# Altium PCB Mosione.PcbDoc
Units mm, origin at the board's own origin, x right, y up, seen from the top; angles counter-clockwise.
Board outline 77.58 x 77.84 mm, 2 copper layers (Top Layer, Bottom Layer); 14 components, 23 nets, 93 pads, 2 vias.
Unrouted connection lines stored in the file: 9.
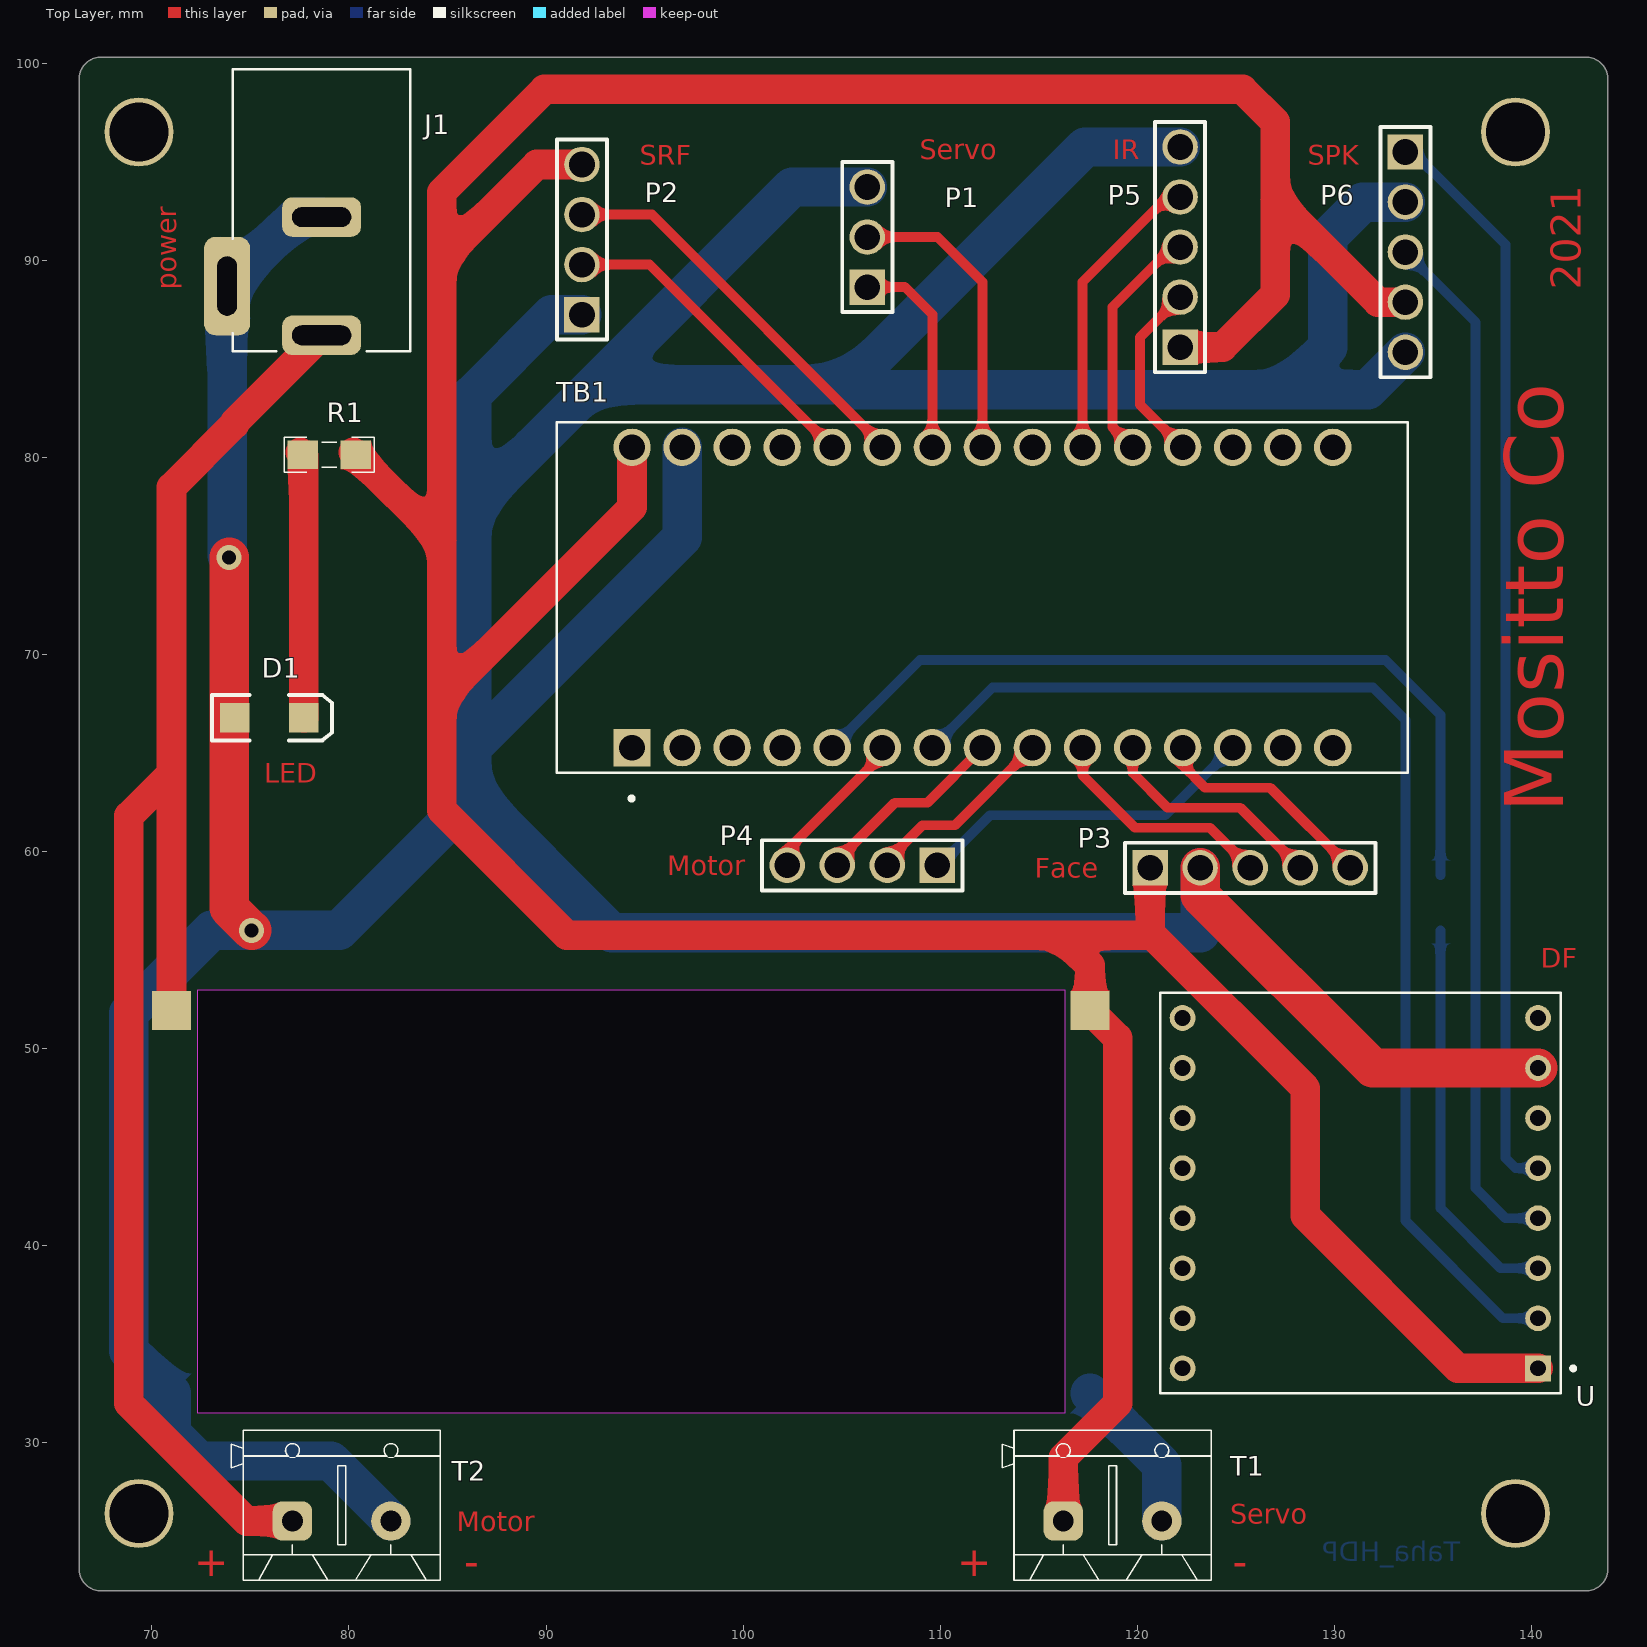
[diagram p0: Top Layer view]
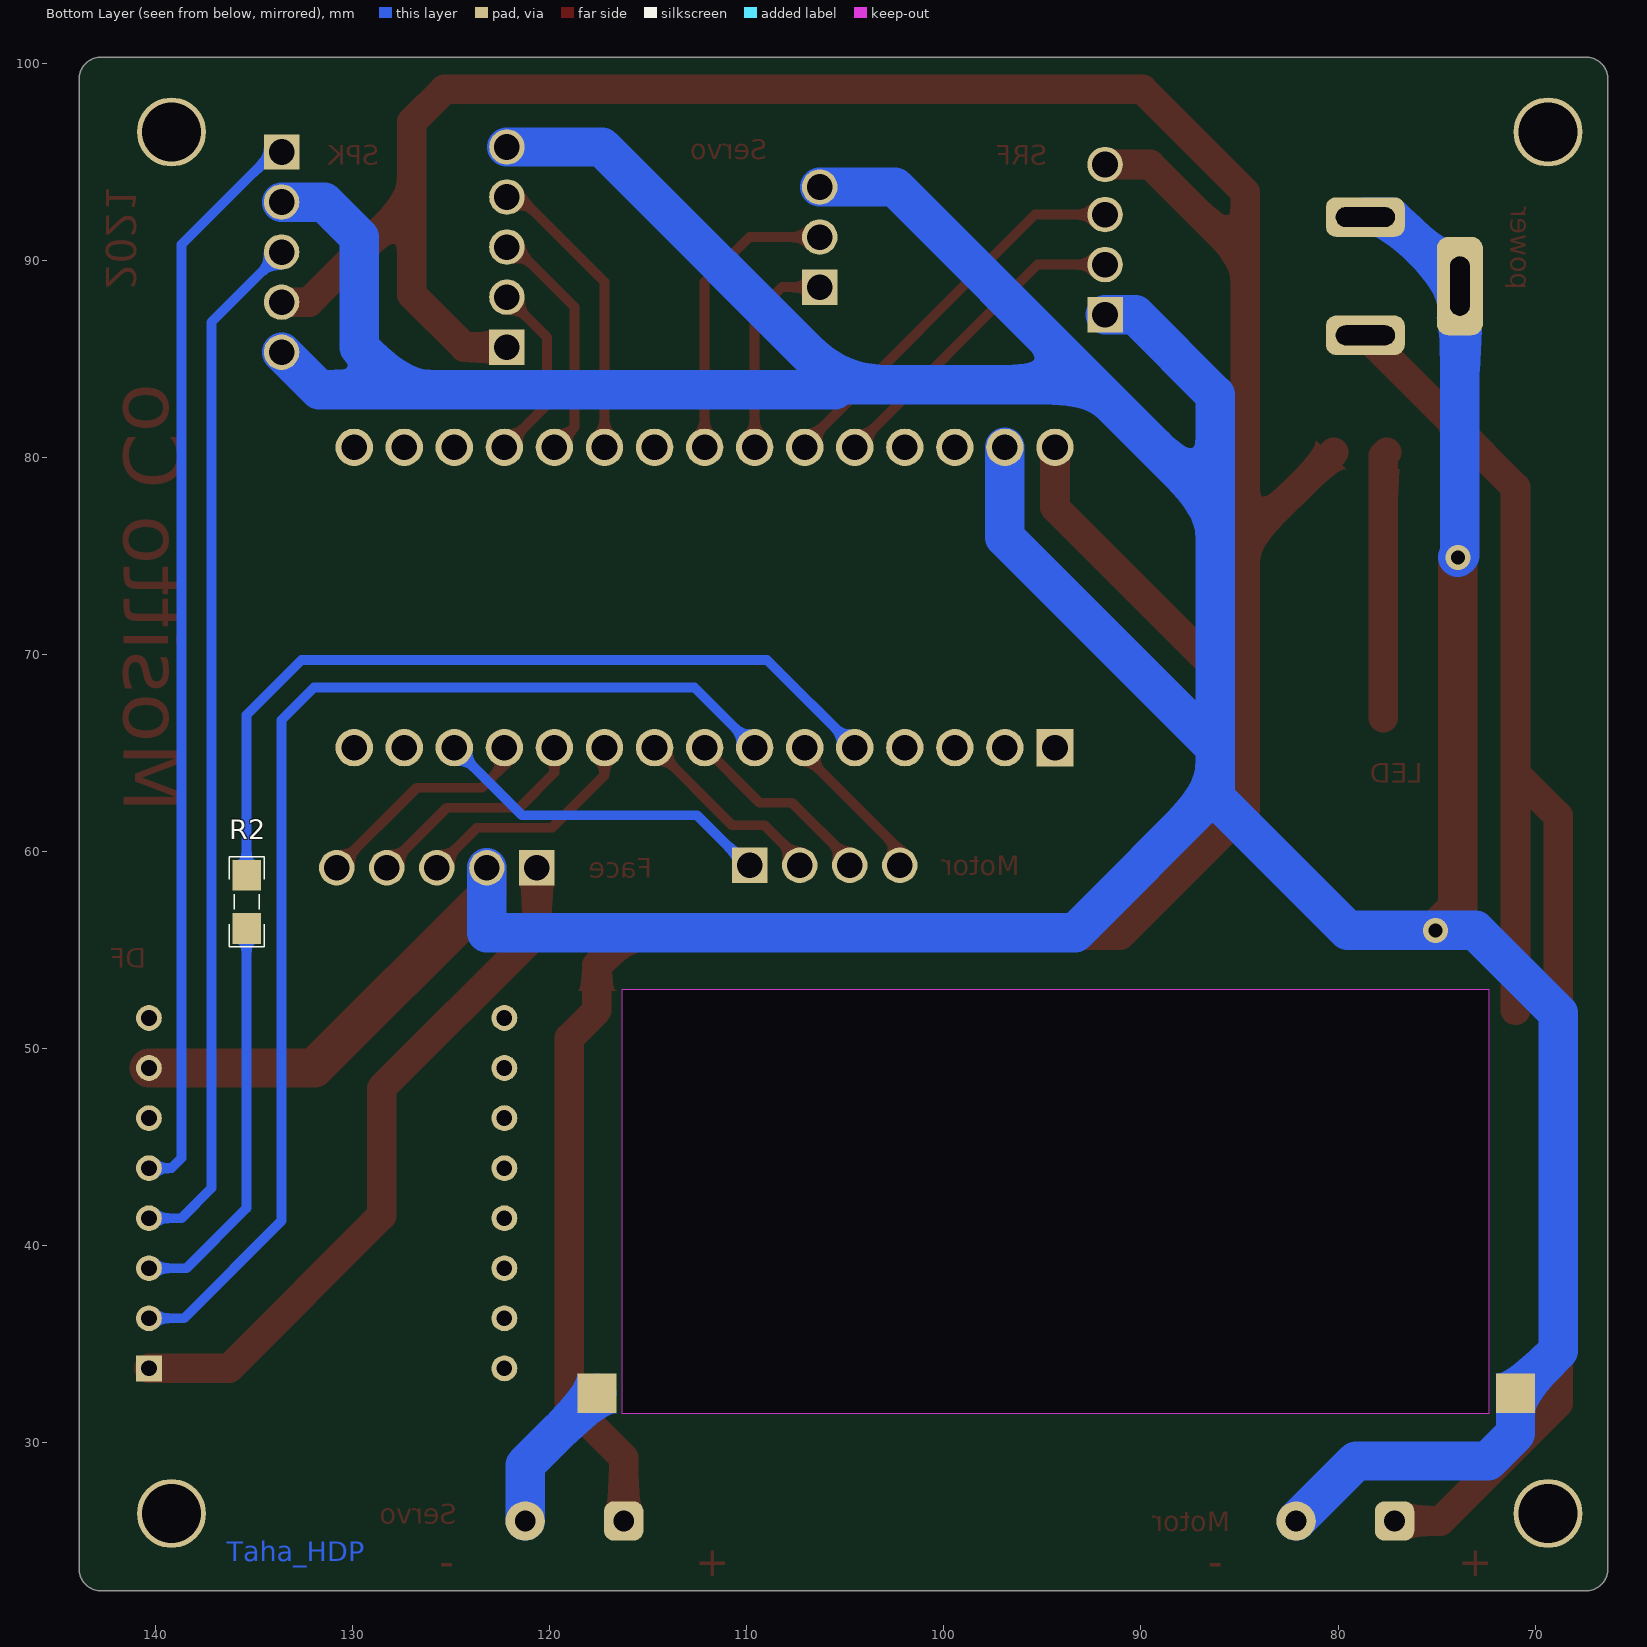
[diagram p1: Bottom Layer view, seen from below]
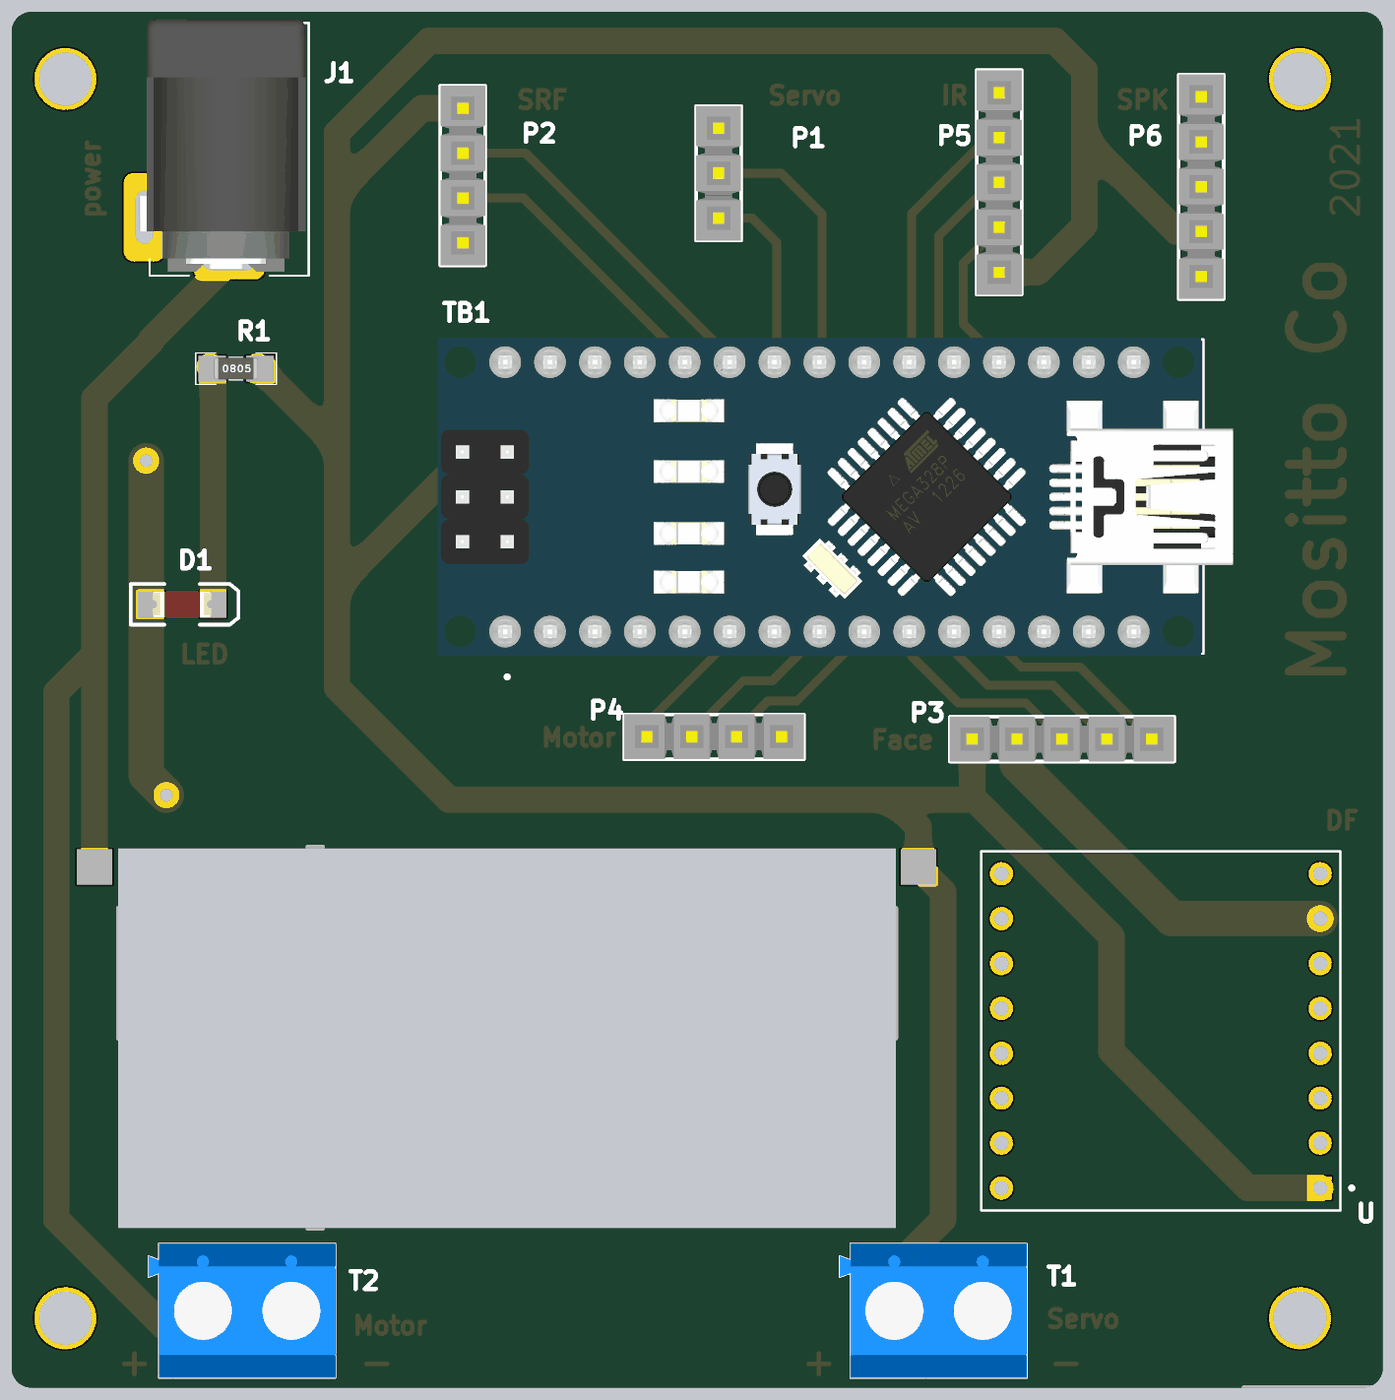
[diagram p2: 3D render of the assembled board from above, using the file's embedded part models]

## Layer stack, top to bottom
Top Solder: solder mask 0.0102, Solder Resist, Dk 3.5
Top Layer: signal copper 0.0356
Dielectric 1: dielectric 0.32, FR-4, Dk 4.8
Bottom Layer: signal copper 0.0356
Bottom Solder: solder mask 0.0102, Solder Resist, Dk 3.5

## Board outline
66.301,23.622 66.301,99.187 cw(c67.437,99.187) 67.437,100.323 142.748,100.323 cw(c142.748,99.187) 143.884,99.187 143.884,23.622 cw(c142.748,23.622) 142.748,22.486 67.437,22.486 cw(c67.437,23.622)
cut-out: 72.332,52.996 116.332,52.996 116.332,31.496 72.332,31.496

## Design rules (kind name [scope] priority, off if disabled: settings)
Clearance [All] p1: gap=0.254 ignorepadtopadclearanceinfootprint=FALSE except(0: Arc-Hole Track-Hole SMDPad-Hole THPad-Hole Via-Hole Fill-Hole Poly-Hole Region-Hole Text-Hole)
PolygonConnect [All] p1: connectstyle=Relief reliefconductorwidth=0.254 reliefentries=4 polygonreliefangle="90 Angle" airgapwidth=0.254
RoutingVias [All] p1: holewidth=0.711 width=1.27 viastyle="Through Hole" minholewidth=0.711 minwidth=1.27 maxholewidth=0.711 maxwidth=1.27
SolderMaskExpansion [All] p1: expansion=0.102
Width "Schematic Width Constraint_6" [InNet('VCC')] p1: maxlimit=2 minlimit=1.5 preferedwidth=1.5
Width "Schematic Width Constraint_2" [InNet('9V')] p2: maxlimit=2 minlimit=0.5 preferedwidth=1.5
Width "Schematic Width Constraint_1" [InNet('GND')] p3: maxlimit=2 minlimit=0.5 preferedwidth=2
Width "Schematic Width Constraint" [InNet('NetD1_2')] p4: maxlimit=2 minlimit=1.5 preferedwidth=1.5
Width [All] p5: maxlimit=1 minlimit=0.3 preferedwidth=0.5 minimp=50.000000 maximp=50.000000 favimp=50.000000
30 further rules are at their usual default settings.

## Components (designator, comment, footprint, x,y, rotation, side; value= is the part's Value field where it differs from the comment)
D1 "SMD 1206 LED" "LED 1206" 75.946,66.802 r0 top
J1 "DC-005" *NINIGI_DC-005 78.613,88.702 r270 top
P1 "Servo" HDR1X3 106.299,88.646 r90 top
P2 "SRF" HDR1X4 91.821,87.249 r90 top
P3 "LCD_face" HDR1X5 120.65,59.182 r0 top
P4 "Motor" HDR1X4 109.855,59.309 r180 top
P5 "IR_sensor" HDR1X5 122.174,85.598 r90 top
P6 "SPK" HDR1X5 133.604,95.504 r270 top
R1 "200" RESC3413X04N 78.994,80.137 r0 top
R2 "1K" RESC3413X04N 135.382,57.451 r90 bottom
T1 "KF301_Terminal" "KF301 2PIN" 118.745,26.035 r0 top
T2 "KF301_Terminal" "KF301 2PIN" 79.629,26.035 r0 top
TB1 "ARDUINO_NANO" *SHIELD_ARDUINO_NANO 112.141,72.898 r90 top
U "DFR0299" MODULE_DFR0299 131.318,42.672 r180 top

## Footprints (in the part's own frame and the unit in brackets; to place one, negate y for a bottom-side part, rotate by r counter-clockwise, add the part's x,y. Pads: shape width x height; smd on the part's side, far side on the other; paste and mask are expansions set on the pad)
*NINIGI_DC-005 [mm]
  rrect50% 5x2.35 hole 1 slot 3 at 0 deg: 2(0,-4.8)
  rrect50% 2x4 hole 1 slot 3 at 90 deg: 3(-3.5,0) 4(2.5,0)
  silkscreen extent -11,-4.5 3.3,4.5, body extent -11.21,-5.08 3.09,4.32, height 11
*SHIELD_ARDUINO_NANO [mm]
  rect 1.9x1.9 hole 1.3: 1(-7.62,17.78)
  round 1.9 hole 1.3: 2(-7.62,15.24) 3(-7.62,12.7) 4(-7.62,10.16) 5(-7.62,7.62) 6(-7.62,5.08) 7(-7.62,2.54) 8(-7.62,0) 9(-7.62,-2.54) 10(-7.62,-5.08) 11(-7.62,-7.62) 12(-7.62,-10.16) 13(-7.62,-12.7) 14(-7.62,-15.24) 15(-7.62,-17.78) 16(7.62,-17.78) 17(7.62,-15.24) 18(7.62,-12.7) 19(7.62,-10.16) 20(7.62,-7.62) 21(7.62,-5.08) 22(7.62,-2.54) 23(7.62,0) 24(7.62,2.54) 25(7.62,5.08) 26(7.62,7.62) 27(7.62,10.16) 28(7.62,12.7) 29(7.62,15.24) 30(7.62,17.78)
  silkscreen extent -10.3,-21.59 8.89,21.59, body extent -9.02,-23.26 8.98,21.74, height 10.1
HDR1X3 [mm] "Connector; Header; 3 Position"
  rect 1.8x1.8 hole 1.3: 1(0,0)
  round 1.8 hole 1.3: 2(2.54,0) 3(5.08,0)
  silkscreen extent -1.27,-1.27 6.35,1.27, body extent -1.26,-1.27 6.36,1.27, height 8.38
HDR1X4 [mm] "Connector; Header; 4 Position"
  rect 1.8x1.8 hole 1.3: 1(0,0)
  round 1.8 hole 1.3: 2(2.54,0) 3(5.08,0) 4(7.62,0)
  silkscreen extent -1.27,-1.27 8.89,1.27, body extent -1.27,-1.28 8.89,1.26, height 8.38
HDR1X5 [mm] "Connector; Header; 5 Position"
  rect 1.8x1.8 hole 1.3: 1(0,0)
  round 1.8 hole 1.3: 2(2.54,0) 3(5.08,0) 4(7.62,0) 5(10.16,0)
  silkscreen extent -1.27,-1.27 11.43,1.27, body extent -1.28,-1.27 11.42,1.27, height 8.38
"KF301 2PIN" [mm] "Designer Abbas Basereh"
  rrect50% 2x2 hole 1.05: 1(-2.5,0)
  round 2 hole 1.05: 2(2.5,0)
  silkscreen extent -5.6,-3 5,4.6, body extent -5.6,-3 5,4.6, height 10
"LED 1206" [mm]
  rect 1.5x1.5 smd: 1(-1.75,0) 2(1.75,0)
  silkscreen extent -2.9,-1.15 3.2,1.15, body extent -1.65,-0.72 1.65,0.73, height 1.36
MODULE_DFR0299 [mm]
  rect 1.308x1.308 hole 0.8: 1(-9.017,8.89)
  round 1.308 hole 0.8: 2(-9.017,6.35) 3(-9.017,3.81) 4(-9.017,1.27) 5(-9.017,-1.27) 6(-9.017,-3.81) 7(-9.017,-6.35) 8(-9.017,-8.89) 9(9.017,-8.89) 10(9.017,-6.35) 11(9.017,-3.81) 12(9.017,-1.27) 13(9.017,1.27) 14(9.017,3.81) 15(9.017,6.35) 16(9.017,8.89)
  silkscreen extent -10.9,-10.16 10.16,10.16
RESC3413X04N [mm] "Chip Resistor, 2-Leads, Body 3/40x1/30mm, IPC Medium Density-Design:Abbas Basereh"
  rect 1.55x1.45 smd: 1(-1.35,0) 2(1.35,0)
  silkscreen extent -2.29,-0.89 2.29,0.89, body extent -1.25,-0.62 1.25,0.62, height 0.79

## Part data
D1: library part "LED SMD 1206"
J1: Package="0603 Ninigi", Availability=Unavailable, MF="Littelfuse Inc.", MP=DC-005, PRICE=None, SnapEDA_Link=https://www.snapeda.com/parts/DC-005/Littelfuse%20Inc./view-part/?ref=snap
P1: library part "Header 3", "Header, 3-Pin", LatestRevisionDate=17-Jul-2002, LatestRevisionNote="Re-released for DXP Platform.", Publisher="Altium Limited"
P2 P4: library part "Header 4", "Header, 4-Pin", LatestRevisionDate=17-Jul-2002, LatestRevisionNote="Re-released for DXP Platform.", Publisher="Altium Limited"
P3 P5 P6: library part "Header 5", "Header, 5-Pin", LatestRevisionDate=17-Jul-2002, LatestRevisionNote="Re-released for DXP Platform.", Publisher="Altium Limited"
R1 R2: library part "RES 0805 0.125W", "RES 0805", Data=16-12-2016, Desc.="RES SMD 0805", Designer="Abbas Basereh"
T1 T2: library part KF301-2Pin_Terminal, "Terminal 2 Pin 250VAC 16A", Designer="Abbas Basereh", Link=https://www.aliexpress.com/item/, Part. No="KF301 2P"
TB1: "ATmega4809 Arduino Nano Every with Headers AVRA® AVR MCU 8-Bit Embedded Evaluation Board", Package=None, Availability=Unavailable, MF=Arduino, MP="ARDUINO NANO", PRICE=None, SnapEDA_Link=https://www.snapeda.com/parts/ARDUINO%20NANO/Arduino/view-part/1128261/?ref=snap
U: "MP3 Player Audio Arduino Platform Evaluation Expansion Board", Package=None, Availability=Unavailable, MF=DFRobot, MP=DFR0299, PRICE=None, SnapEDA_Link=https://www.snapeda.com/parts/DFR0299/DFRobot/view-part/588059/?ref=snap

## Free pads (board coordinates)
  rect 2x2 smd far side: 13(117.602,32.512) 14(70.993,32.512)
  rect 2x2 smd: 14(70.993,51.943) 14(117.602,51.943)
  round 3.5 hole 3: 15(69.342,26.416) 15(69.342,96.52) 15(139.192,26.416) 15(139.192,96.52)

## Via types
v1: diameter 1.27, hole 0.711, Top Layer to Bottom Layer, 2 vias

## Nets (pads, with @x,y where several pads share a name; then routed paths per layer and width w, separated by ;. In a path a pad name is that pad's centre, name@x,y a point inside that pad or via, vN(x,y) a via of type N, cw(c..) or ccw(c..) an arc to the next point about the centre after c; other vN are vias at no path point)
9V: J1.4 pad.14@70.993,51.943 T2.1 | length 81
  Top Layer w1.5: pad.14@70.993,51.943 70.993,63.973 ; T2.1 74.803,26.035 68.834,32.004 68.834,61.814 70.993,63.973 ; J1.4 74.199,81.788 74.199,81.692 70.993,78.486 70.993,63.973
CLK: P3.5 TB1.12 | length 11.6
  Top Layer w0.5: TB1.12 122.301,64.389 123.444,63.246 126.746,63.246 P3.5
CS: P3.4 TB1.11 | length 11.8
  Top Layer w0.5: TB1.11 119.761,64.008 121.539,62.23 125.222,62.23 P3.4
DIN: P3.3 TB1.10 | length 11.9
  Top Layer w0.5: TB1.10 117.221,63.881 119.888,61.214 123.698,61.214 P3.3
echo: P2.2 TB1.26 | length 16.5
  Top Layer w0.5: P2.2 95.25,89.789 TB1.26
GND: D1.1 J1.2 J1.3 P1.3 P2.1 P3.2 P5.5 P6.2 P6.5 pad.13 pad.14@70.993,32.512 T1.2 T2.2 TB1.4 TB1.29 U.7 | length 321.1
  Top Layer w2: v1(73.914,74.93) 73.914,57.15 v1(75.057,56.007) ; P3.2 123.19,57.785 131.953,49.022 U.7
  Bottom Layer w2: v1(73.914,74.93) 73.813,75.031 J1.2 77.313,92.202 J1.3 ; T2.2 79.081,29.083 72.39,29.083 70.993,30.48 70.993,32.512 68.834,34.671 68.834,51.816 73.025,56.007 v1(75.057,56.007) 79.502,56.007 86.233,62.738 86.233,65.278 96.901,75.946 TB1.29 ; 86.233,62.992 93.345,55.88 123.19,55.88 P3.2 ; 86.233,65.532 86.233,77.47 ; P2.1 90.297,87.249 86.233,83.185 86.233,77.47 ; P1.3 102.489,93.726 92.456,83.693 ; pad.13 121.245,28.869 T1.2 ; P5.5 117.348,95.758 105.283,83.693 ; P6.5 131.704,83.444 127.513,83.444 ; P6.2 131.445,92.964 129.667,91.186 129.667,85.598 127.513,83.444 ; 86.233,77.47 92.456,83.693 ; 92.456,83.693 105.283,83.693 ; 105.283,83.693 105.532,83.444 127.513,83.444
IN1: P4.1 TB1.13 | length 17.5
  Bottom Layer w0.5: P4.1@109.855,59.182 112.522,61.849 121.412,61.849 TB1.13
IN2: P4.2 TB1.9 | length 10.1
  Top Layer w0.5: P4.2@107.315,59.182 P4.2 107.315,59.563 109.093,61.341 110.744,61.341 TB1.9
IN3: P4.3 TB1.8 | length 10.3
  Top Layer w0.5: P4.3 104.902,59.436 104.902,59.69 107.696,62.484 109.347,62.484 TB1.8 TB1.8@112.395,65.532
IN4: P4.4 TB1.6 | length 8.1
  Top Layer w0.5: P4.4@102.235,59.182 P4.4 102.235,60.071 107.061,64.897 TB1.6
"IR 1": P5.2 TB1.19 | length 9.4
  Top Layer w0.5: P5.2 120.142,86.106 120.142,82.677 TB1.19
"IR 2": P5.3 TB1.20 | length 12.2
  Top Layer w0.5: TB1.20 118.745,81.534 118.745,87.63 121.793,90.678 P5.3
"IR 3": P5.4 TB1.21 | length 15.1
  Top Layer w0.5: TB1.21 117.221,88.9 121.539,93.218 P5.4
L: P6.1 U.5 | length 55.2
  Bottom Layer w0.5: P6.1 133.985,95.504 138.684,90.805 138.684,86.614 138.684,44.45 139.192,43.942 U.5
NetD1_2: D1.2 R1.1 | length 13.5
  Top Layer w1.5: R1.1@77.517,80.264 77.696,80.085 77.696,78.105 D1.2
NetR2_2: R2.2 TB1.5 | length 42
  Bottom Layer w0.5: TB1.5 108.966,69.723 132.588,69.723 135.382,66.929 R2.2
R: P6.3 U.4 | length 52.8
  Bottom Layer w0.5: P6.3 137.16,86.868 137.16,85.598 137.16,42.926 138.684,41.402 U.4
RX: TB1.7 U.2 | length 60.1
  Bottom Layer w0.5: TB1.7 112.649,68.326 131.953,68.326 133.604,66.675 133.604,41.275 138.557,36.322 U.2
SCL: P1.1 TB1.24 | length 10.6
  Top Layer w0.5: P1.1 108.204,88.646 109.601,87.249 TB1.24
SDA: P1.2 TB1.23 | length 15.2
  Top Layer w0.5: P1.2 109.855,91.186 112.141,88.9 TB1.23
trig: P2.3 TB1.25 | length 20.2
  Top Layer w0.5: P2.3 95.377,92.329 107.061,80.645 TB1.25
TX: R2.1 U.3 | length 20.3
  Bottom Layer w0.5: R2.1@135.382,56.007 135.382,41.91 138.43,38.862 U.3
VCC: P2.4 P3.1 P5.1 P6.4 pad.14@117.602,51.943 R1.2 T1.1 TB1.30 U.1 | length 238.9
  Top Layer w1.5: R1.2@80.217,80.264 84.709,75.772 ; P2.4 89.535,94.869 84.709,90.043 ; TB1.30 94.361,77.47 84.709,67.818 ; T1.1 116.245,29.25 118.999,32.004 118.999,50.546 117.602,51.943 117.602,54.229 116.078,55.753 ; P3.1 120.65,56.007 120.396,55.753 ; P5.1 124.333,85.598 127,88.265 127,93.091 ; P6.4 132.207,87.884 127,93.091 ; U.1 136.271,33.782 128.524,41.529 128.524,48.006 120.777,55.753 120.396,55.753 ; 84.709,67.818 84.709,62.103 91.059,55.753 116.078,55.753 ; 84.709,67.818 84.709,75.772 ; 84.709,75.772 84.709,90.043 ; 84.709,90.043 84.709,93.472 89.916,98.679 125.349,98.679 127,97.028 127,93.091 ; 116.078,55.753 120.396,55.753
pads on no net: TB1.1 TB1.2 TB1.3 TB1.14 TB1.15 TB1.16 TB1.17 TB1.18 TB1.22 TB1.27 TB1.28 U.6 U.8 U.9 U.10 U.11 U.12 U.13 U.14 U.15 U.16

## Other copper
Top Layer:
  text "Servo" at 108.966,95.123 h1
  text "IR" at 118.745,95.123 h1
  text "SRF" at 94.742,94.869 h1
  text "SPK" at 128.651,94.869 h1
  text "power" at 71.247,88.519 h1 r90
  text "2021" at 142.494,88.519 h1.52 r90
  text "LED" at 75.692,63.5 h1
  text "Mositto Co" at 141.605,61.976 h3 r90
  text "Motor" at 96.139,58.801 h1
  text "Face" at 114.808,58.674 h1
  text "DF" at 140.462,54.102 h1
  text "Servo" at 124.714,25.908 h1
  text "Motor" at 85.471,25.527 h1
  text "+" at 72.136,23.241 h1.52
  text "-" at 85.852,23.241 h1.52
  text "+" at 110.871,23.241 h1.52
  text "-" at 124.841,23.241 h1.52
Bottom Layer:
  text "Taha_HDP" at 136.398,24.003 h1

## Silkscreen, mask and mechanical layers (free items; w line width, h text height)
Mechanical 1:
  lines w0.1: 66.301,23.622 ccw(c67.437,23.622) 67.437,22.486 142.748,22.486 ccw(c142.748,23.622) 143.884,23.622 143.884,99.187 ccw(c142.748,99.187) 142.748,100.323 67.437,100.323 ccw(c67.437,99.187) 66.301,99.187 66.301,23.622 ; 72.332,31.496 116.332,31.496 116.332,52.996 72.332,52.996 72.332,31.496

## Dimensions
136.017,100.457 to 142.748,22.486 on Top Paste
83.058,53.086 to 72.332,31.496 on Top Paste
72.332,42.246 to 116.332,42.246 on Top Paste